# Altium PCB VA_NodeV1.2.PcbDoc (part 1 of 4)
Units mil, origin at the board's own origin, x right, y up, seen from the top; angles counter-clockwise.
Board outline 2925 x 2390 mil, 2 copper layers (Top Layer, Bottom Layer), stack 57 mil thick; 152 components, 110 nets, 488 pads, 205 vias.
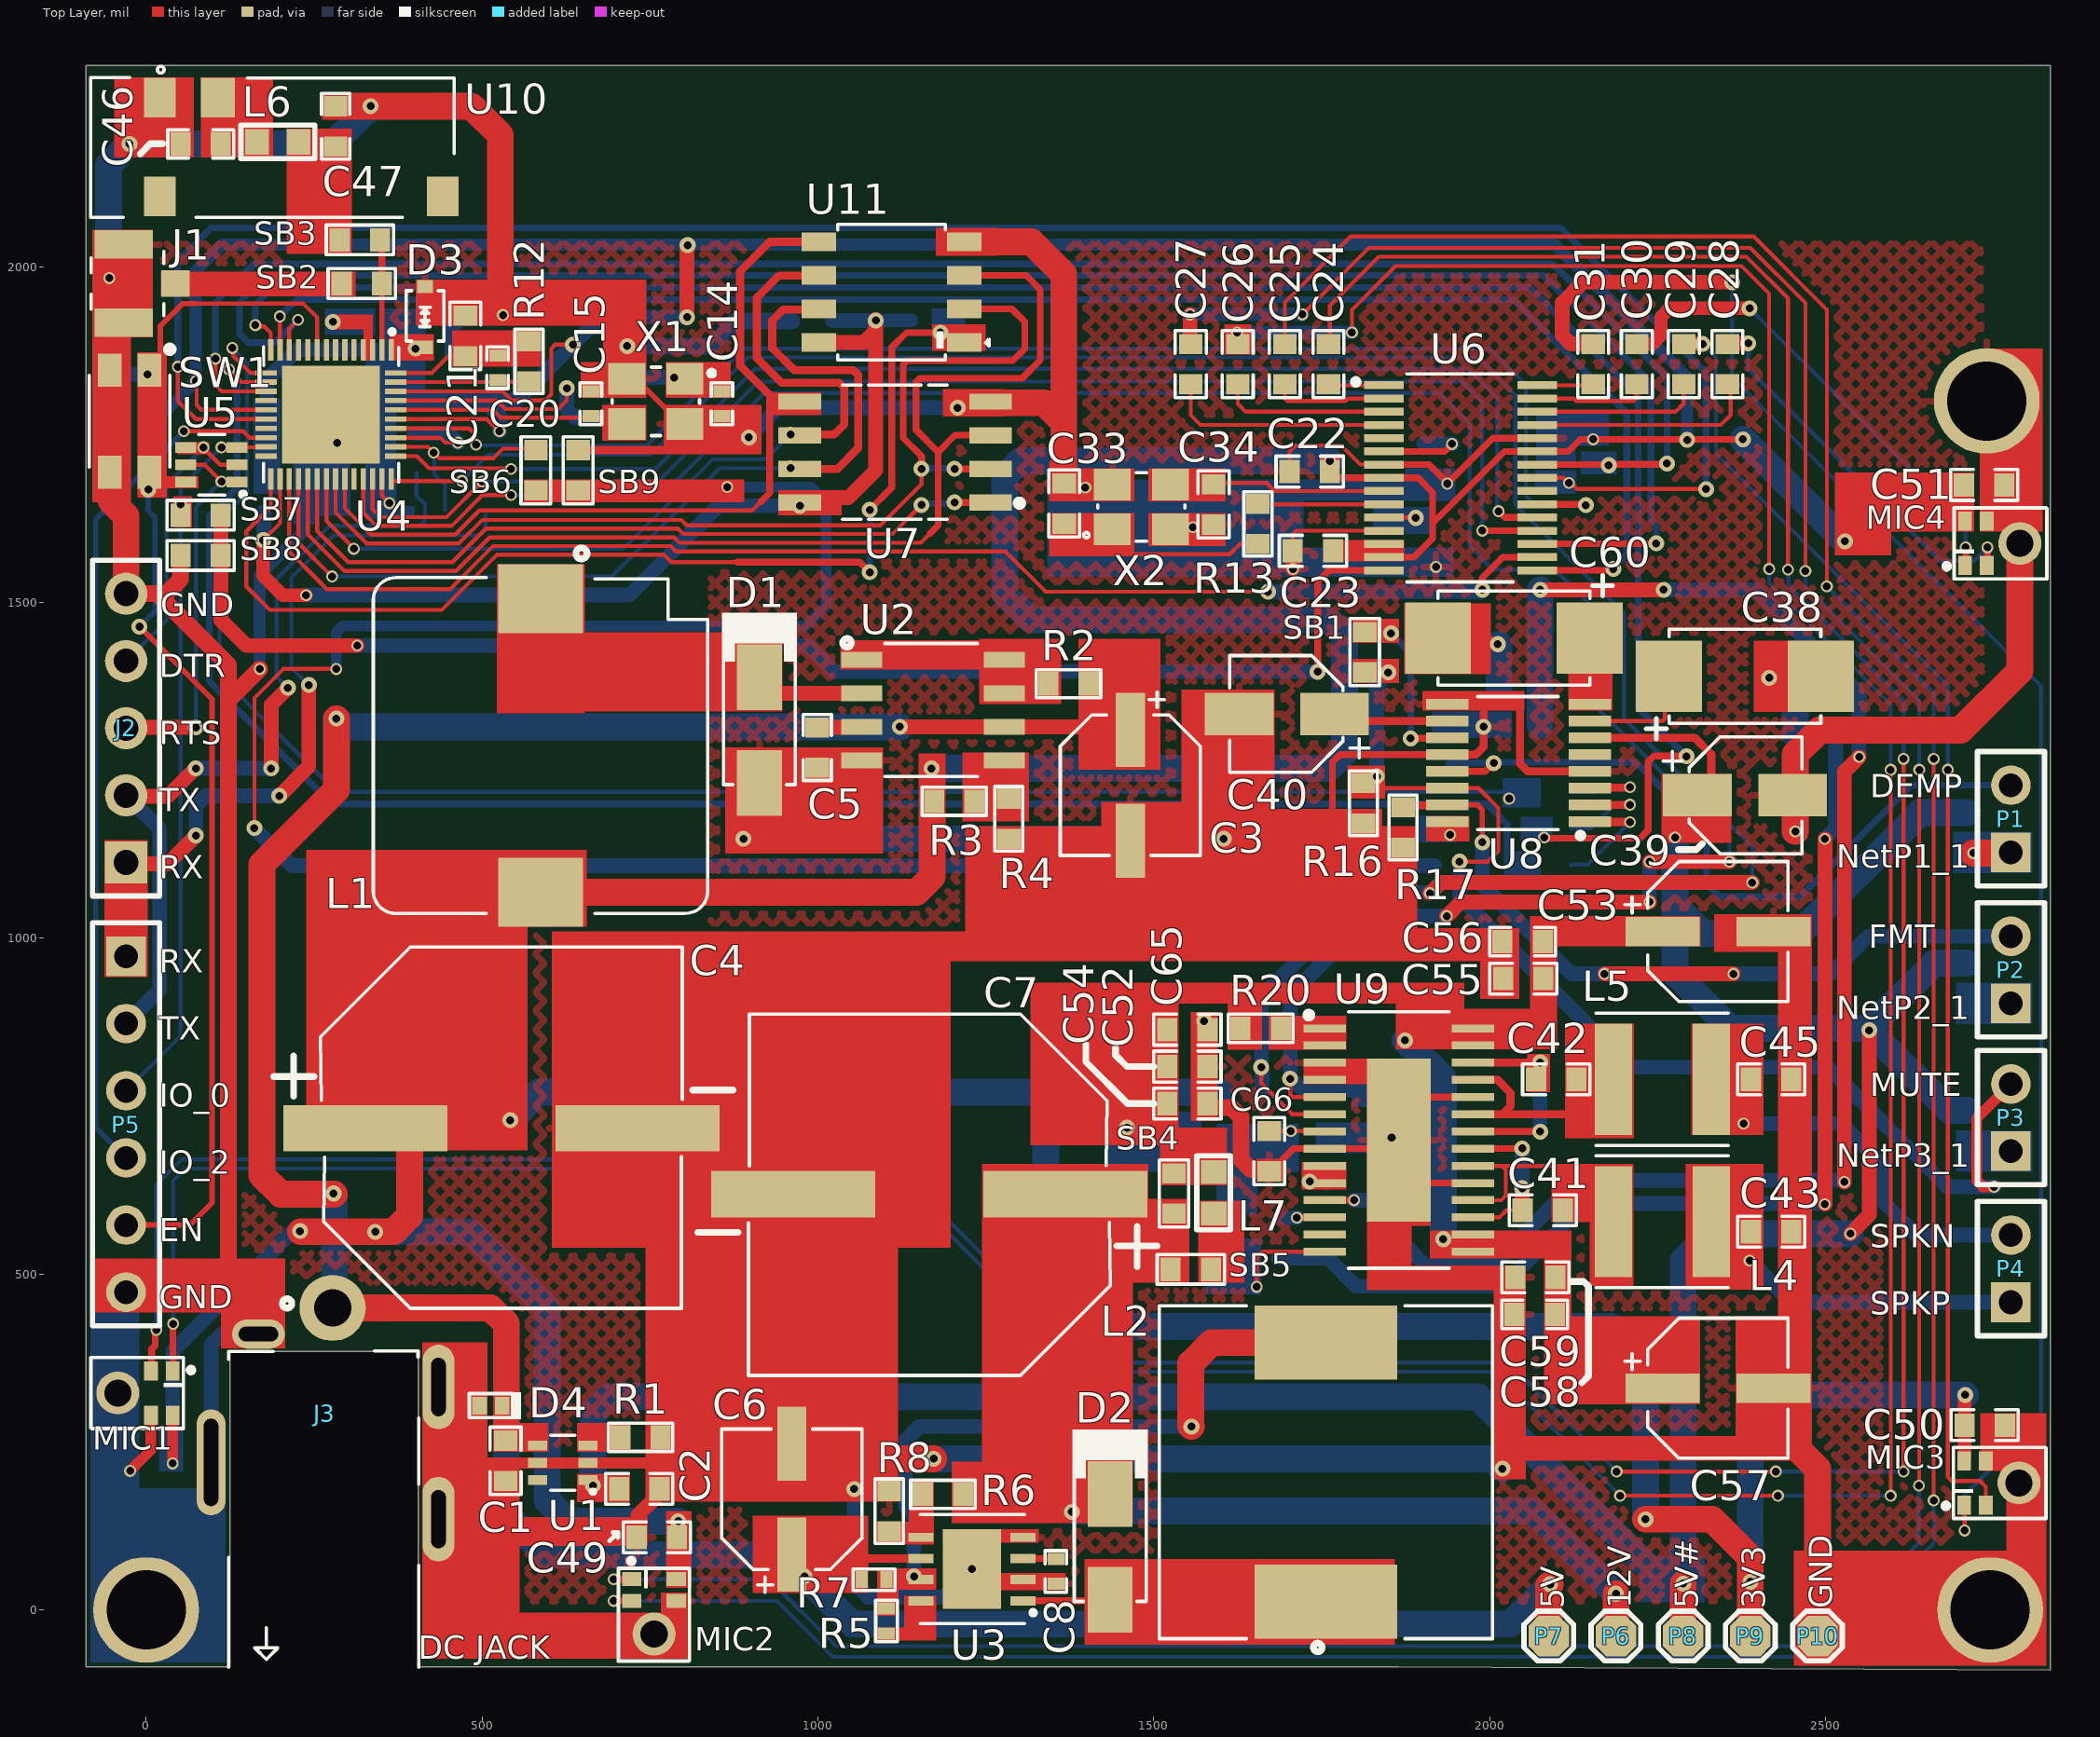
[diagram p0: Top Layer view]
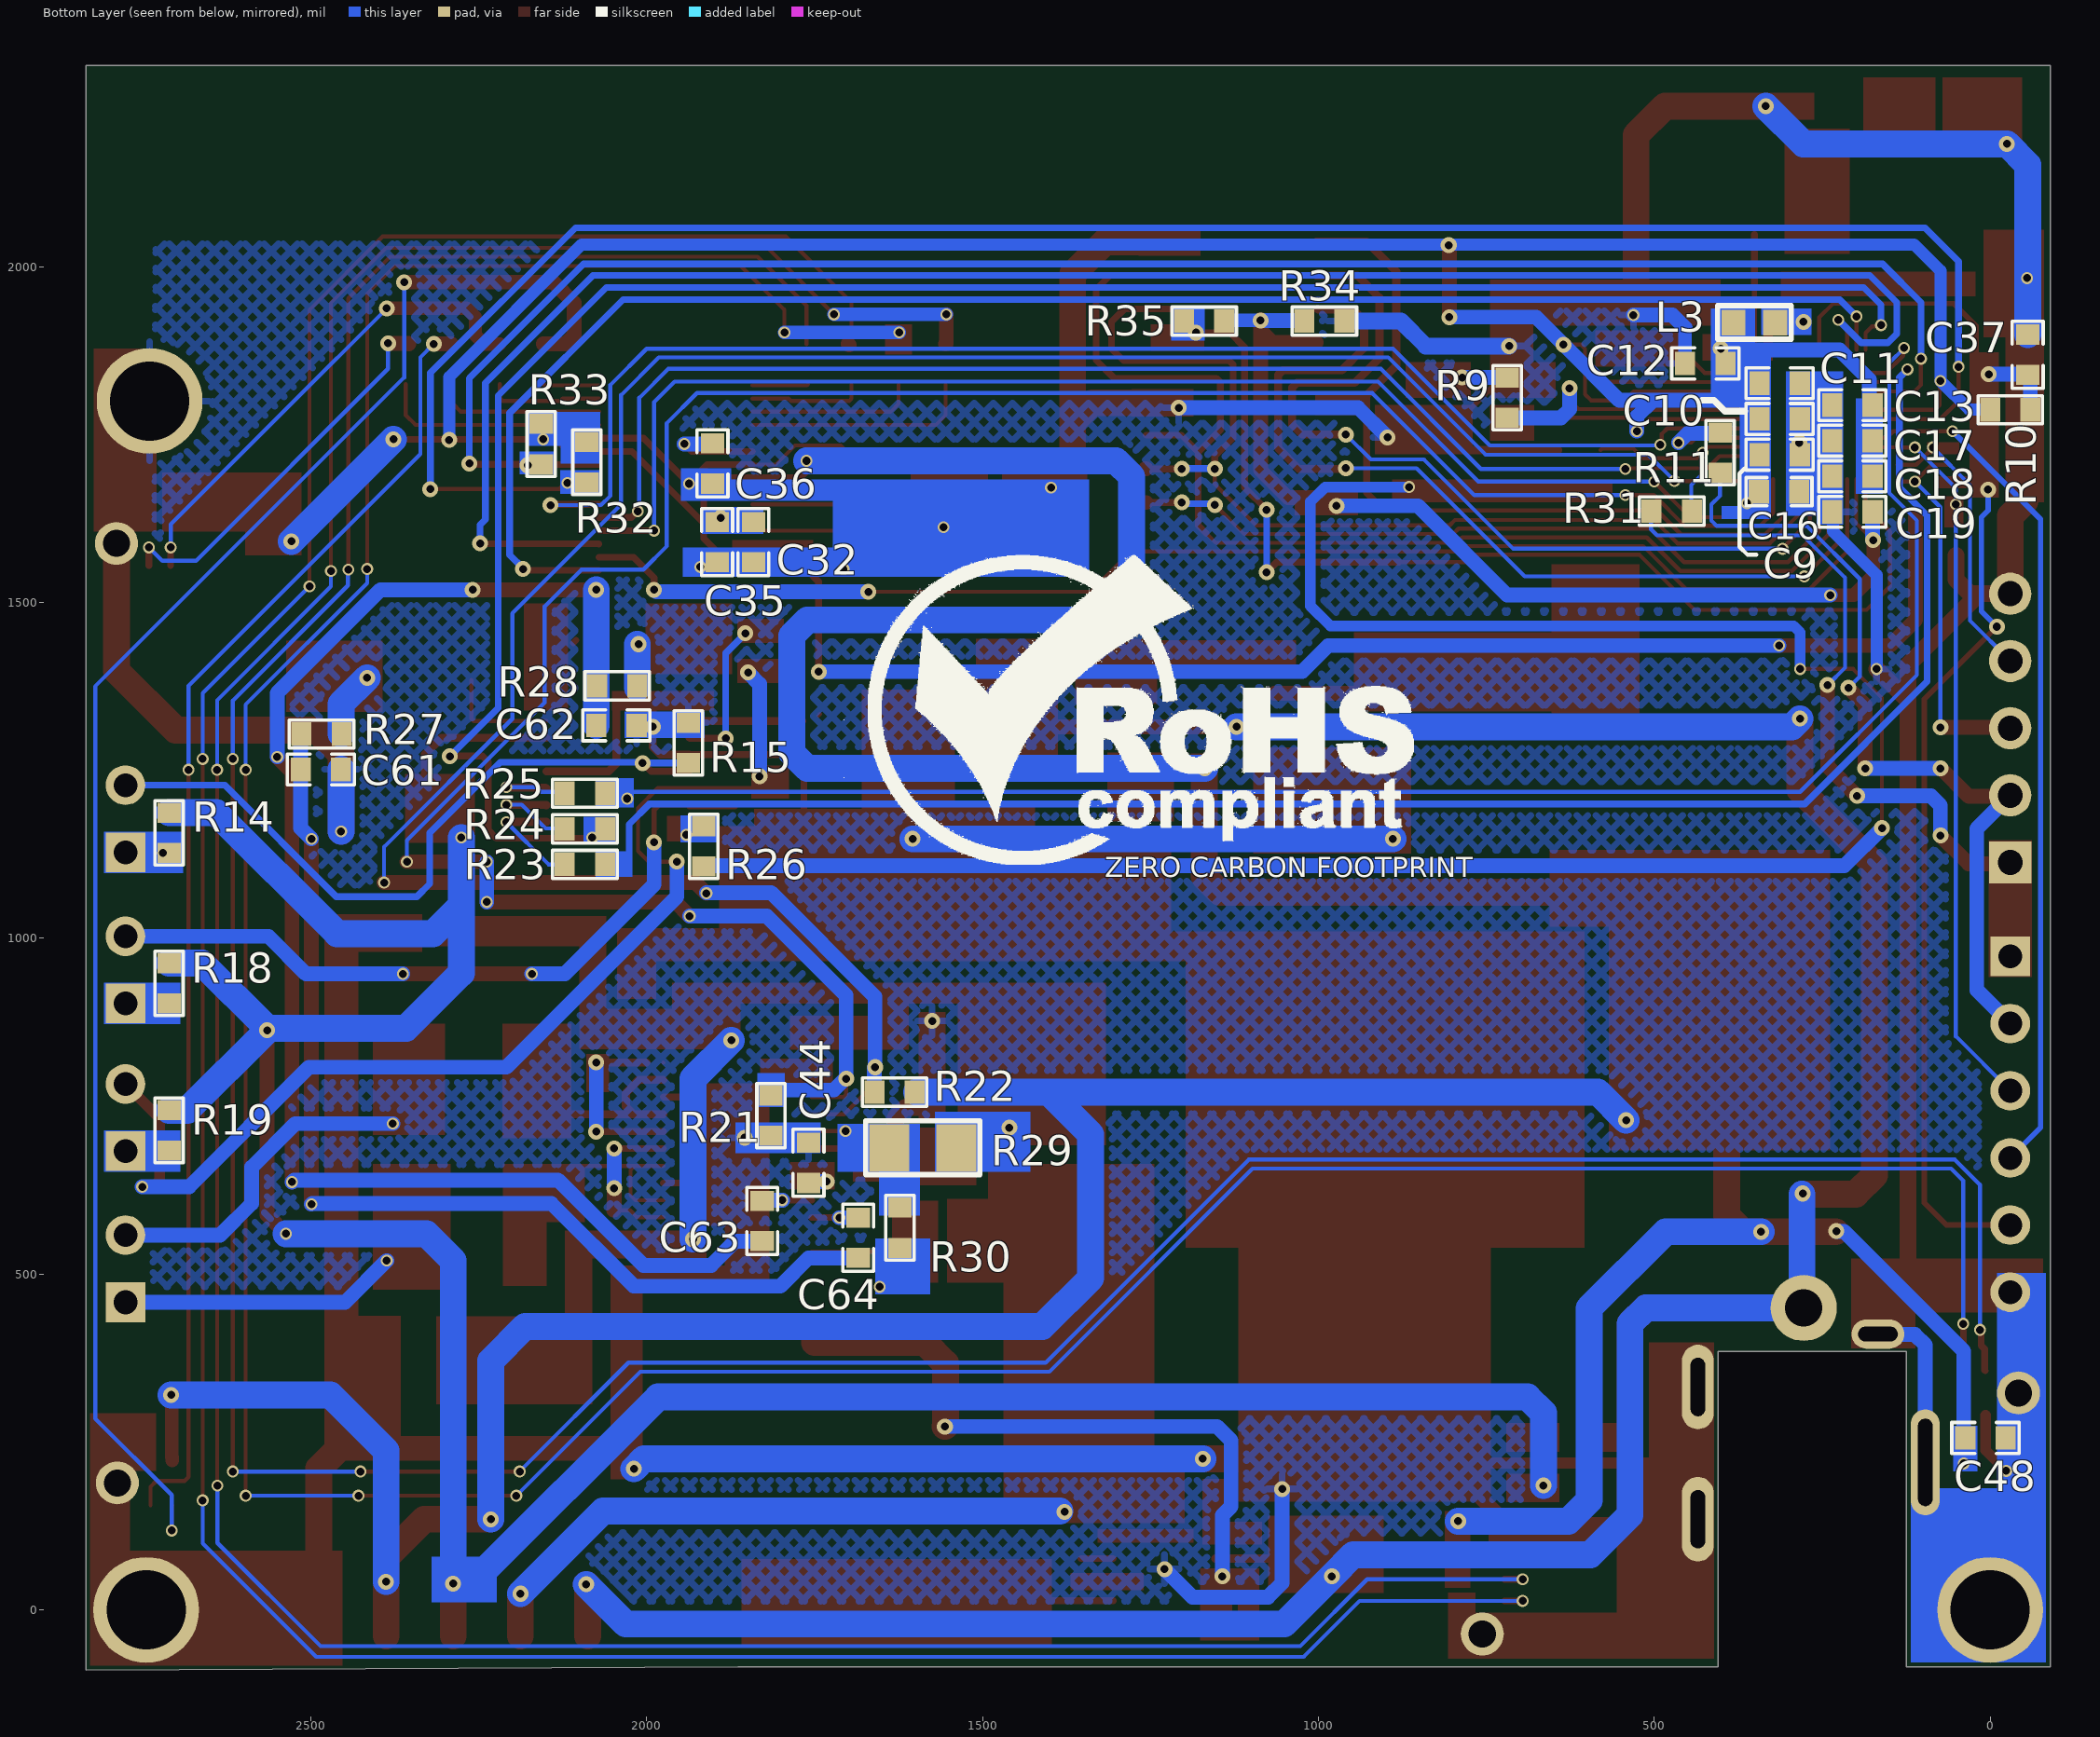
[diagram p1: Bottom Layer view, seen from below]
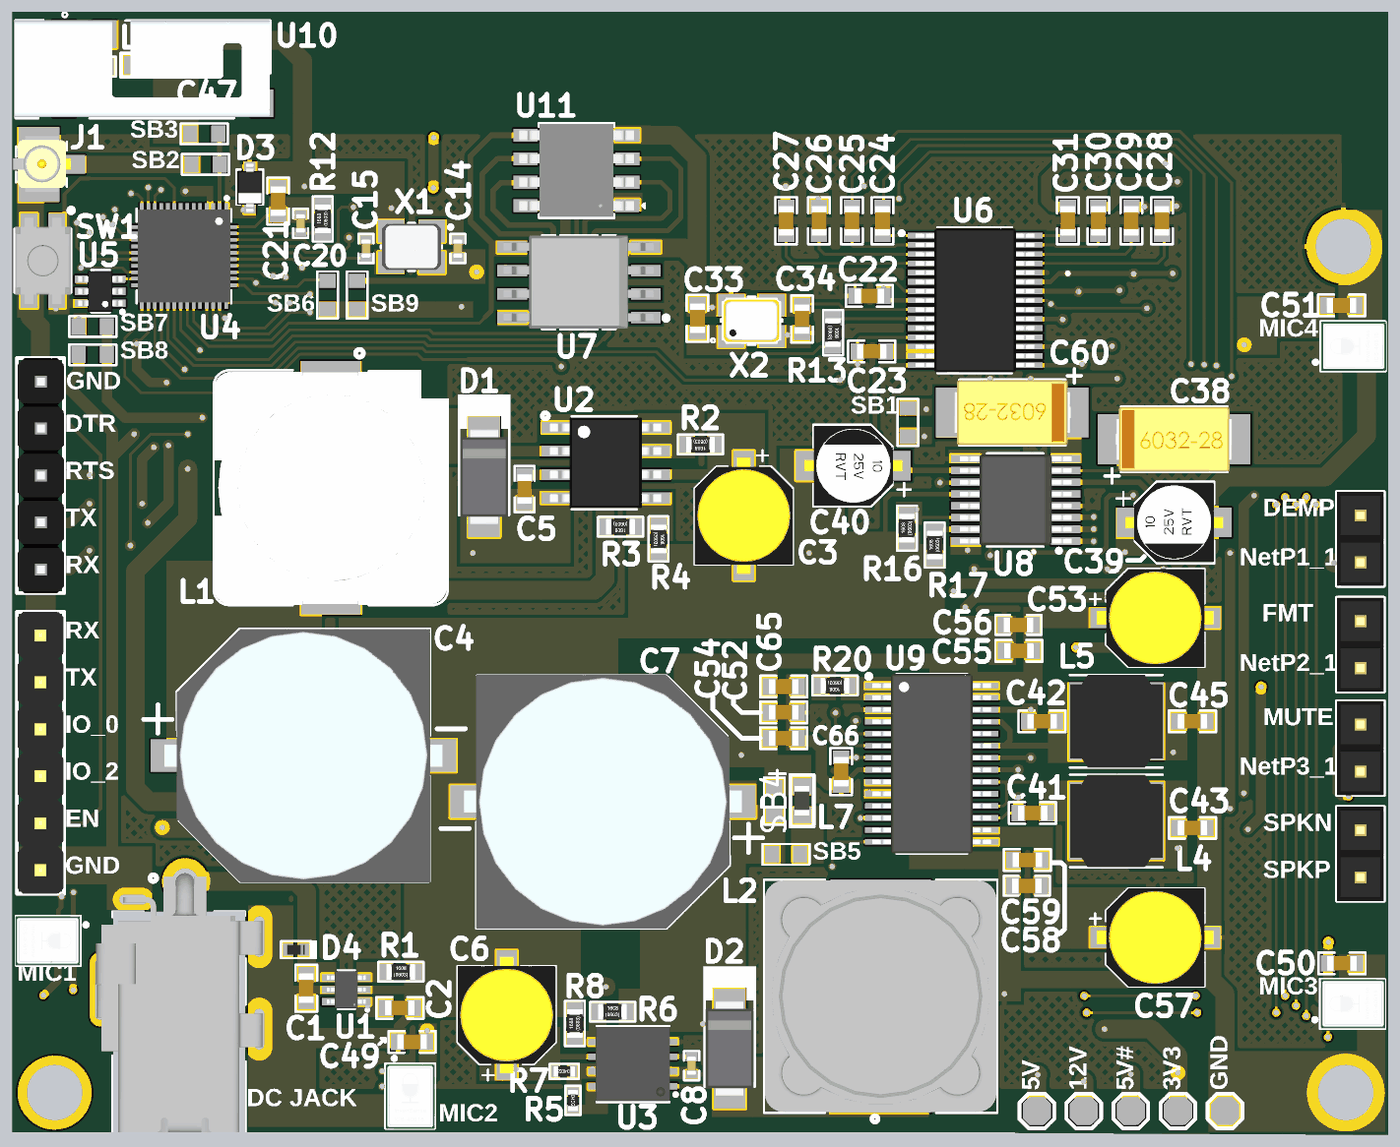
[diagram p3: 3D render of the assembled board from above, using the file's embedded part models]
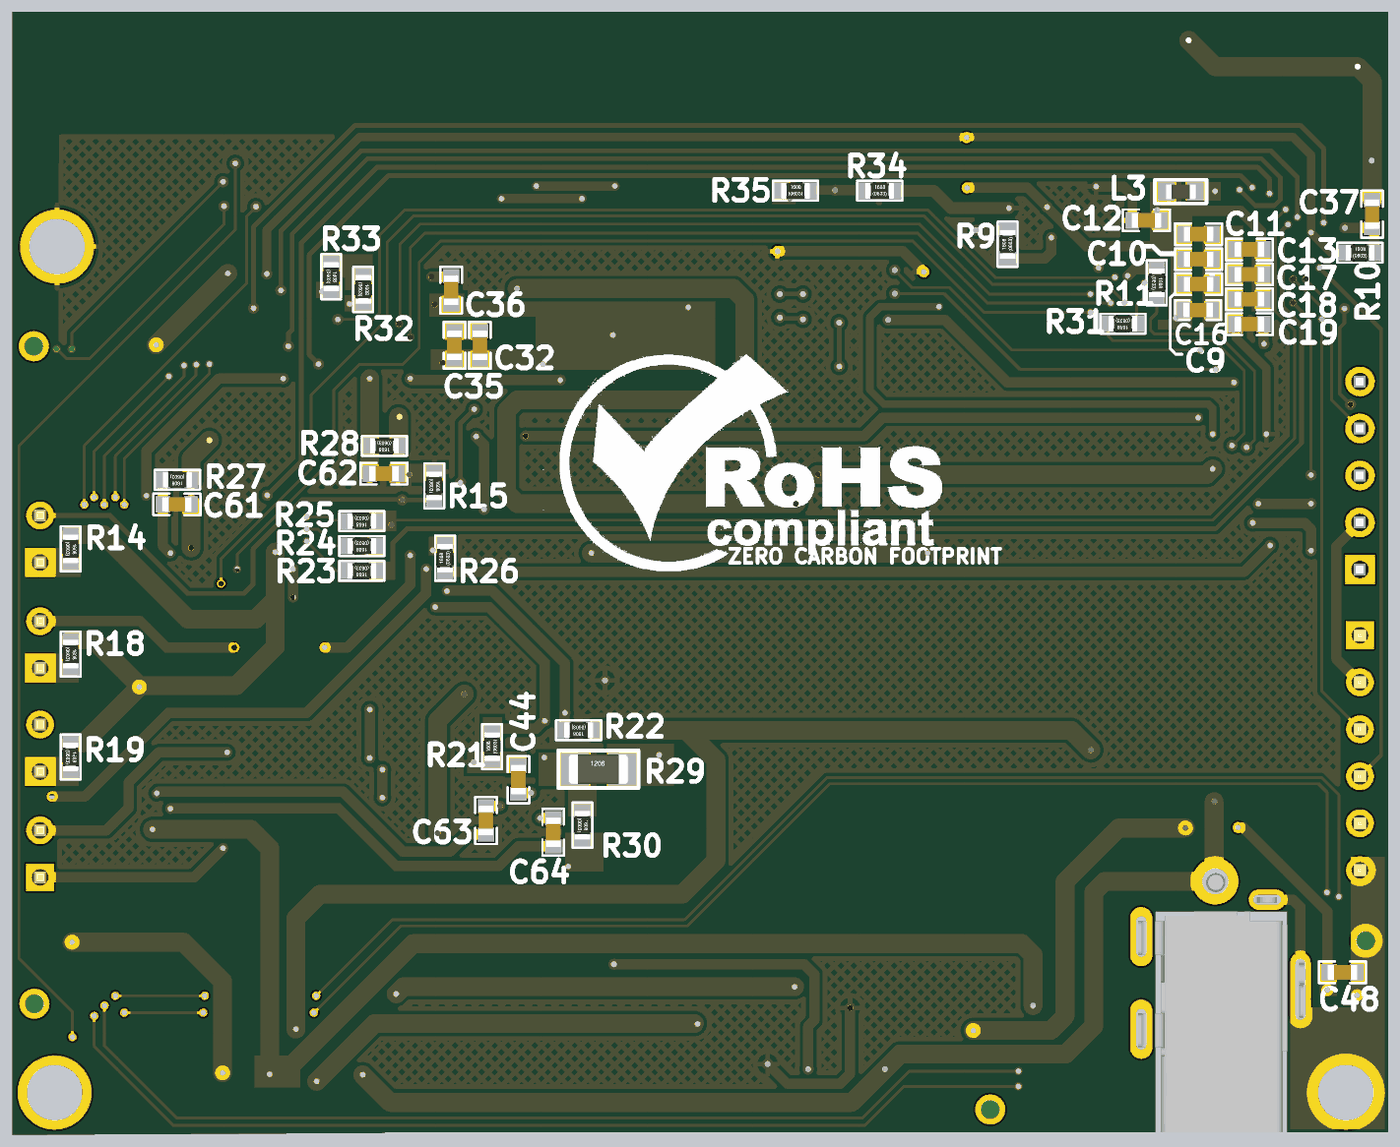
[diagram p4: 3D render of the assembled board from below, using the file's embedded part models]

## Layer stack, top to bottom
Top Solder: solder mask 3, Solder Resist, Dk 3.5
Top Layer: signal copper 10
Dielectric 1: dielectric 37, FR-4, Dk 4.8
Bottom Layer: signal copper 10
Bottom Solder: solder mask 3, Solder Resist, Dk 3.5

## Board outline
-90,-85 -90,130 -90,2300 2835,2300 2835,-90 1863.75,-85 405,-85 405,385 125,385 125,-85

## Design rules (kind name [scope] priority, off if disabled: settings)
Clearance [All] p1: gap=7 ignorepadtopadclearanceinfootprint=FALSE except(0: Arc-Hole Track-Hole SMDPad-Hole THPad-Hole Via-Hole Fill-Hole Poly-Hole Region-Hole Text-Hole; 4: Arc-SMDPad Track-SMDPad SMDPad-SMDPad)
HoleSize [All] p1: absolutevalues=TRUE maxlimit=1000 minlimit=1 maxpercent=80.000 minpercent=20.000
HoleToHoleClearance [All] p1: gap=0 allowstackedmicrovias=TRUE
MinimumSolderMaskSliver [All] p1: minsoldermaskwidth=0
PolygonConnect [All] p1: connectstyle=Relief reliefconductorwidth=10 reliefentries=4 polygonreliefangle="90 Angle" airgapwidth=10
RoutingVias [All] p1: holewidth=11.81 width=23.62 viastyle="Through Hole" minholewidth=11.81 minwidth=17.72 maxholewidth=11.81 maxwidth=23.62
SilkToSilkClearance [All] p1: silktosilkclearance=0
SilkToSolderMaskClearance [IsPad] p1: minsilkscreentomaskgap=0 clearancetoexposedcopper=TRUE
SolderMaskExpansion [All] p1: expansion=4 istentingtop=FALSE
Width [All] p1: maxlimit=40 minlimit=6 preferedwidth=22
25 further rules are at their usual default settings.

## Classes and differential pairs
component class U_Power_Section: C1 C2 C3 C4 C5 C6 C7 C8 D1 D2 L1 L2 P6 P7 P8 P9 P10 R1 R2 R3 R4 R5 R6 R7 R8 S U1 U2 U3
component class U_Mic_Section: C48 C49 C50 C51 MIC1 MIC2 MIC3 MIC4 S
component class U_Memory_Section: C19 R34 R35 S U7 U11
component class U_DAC_Section: C38 C39 C40 C60 C61 C62 P1 P2 P3 R14 R15 R16 R17 R18 R19 R23 R24 R25 R26 R27 R28 S SB1 U8
component class U_Controller_Section: C9 C10 C11 C12 C13 C14 C15 C16 C17 C18 C20 C21 C37 D3 L3 R9 R10 R11 R12 R31 S SB6 SB7 SB8 SB9 SW1 U4 U5 X1
component class U_Connector_Section: C46 C47 D4 J1 J2 J3 L6 P5 S SB2 SB3 U10
component class U_Amplifier_Section: C41 C42 C43 C44 C45 C52 C53 C54 C55 C56 C57 C58 C59 C63 C64 C65 C66 L4 L5 L7 P4 R20 R21 R22 R29 R30 S SB4 SB5 ss U9
component class U_ADC_Section: C22 C23 C24 C25 C26 C27 C28 C29 C30 C31 C32 C33 C34 C35 C36 R13 R32 R33 S U6 X2

## Components (designator, comment, footprint, x,y, rotation, side; value= is the part's Value field where it differs from the comment)
C1 "0.1uF" Cap0603#1 535,222 r90 top locked
C2 "0.1uF" Cap0603#1 734,180 r180 top locked
C3 "100uF" VKMB1001E101MV 1465,1227.68 r270 top locked
C4 "470uF" VT1H471MI135000CE0 529,717 r0 top
C5 "470pF" Cap0603#2 999,1284 r90 top locked
C6 "100uF" VKMB1001E101MV 961,165 r90 top
C7 "470uF" VT1H471MI135000CE0 1165.56,619 r180 top
C8 "1500pF" "Cap 0402" 1354.25,57.25 r90 top locked
C9 "10uF" Cap0603#1 313.23,1720.15 r0 bottom
C10 "1uF" Cap0603#1 313.23,1773.3 r0 bottom
C11 "0.1uF" Cap0603#1 313.23,1826.44 r0 bottom
C12 "1uF" Cap0603#1 424,1856 r180 bottom
C13 "0.1uF" Cap0603#1 205,1794 r180 bottom
C14 "22PF" Cap0402 857,1796 r90 top locked
C15 "22PF" Cap0402 662,1796 r270 top locked
C16 "100pF" "Cap 0603" 314.23,1665 r180 bottom
C17 "0.1uF" Cap0603#1 205,1741 r180 bottom
C18 "0.1uF" Cap0603#1 205,1688 r180 bottom
C19 "4.7uF" Cap0603#1 205,1635 r180 bottom
C20 "3.3nF" Cap0402 523,1849.5 r90 top locked
C21 "10nF" Cap0603#1 475,1897 r270 top locked
C22 "10uF" Cap0603#1 1732,1695 r0 top
C23 "0.1uF" Cap0603#1 1736.83,1577 r0 top
C24 "2.2uF" Cap0603#1 1760,1855 r90 top locked
C25 "2.2uF" Cap0603#1 1695,1855 r90 top locked
C26 "2.2uF" Cap0603#1 1625,1855 r90 top locked
C27 "2.2uF" Cap0603#1 1555,1855 r90 top locked
C28 "2.2uF" Cap0603#1 2354,1855 r90 top locked
C29 "2.2uF" Cap0603#1 2289,1855 r90 top locked
C30 "2.2uF" Cap0603#1 2219,1855 r90 top locked
C31 "2.2uF" Cap0603#1 2154,1855 r90 top locked
C32 "1uF" Cap0603#1 1841,1590 r270 bottom
C33 "18pF" Cap0603#1 1366.52,1647.31 r90 top
C34 "18pF" Cap0603#1 1589,1646 r270 top
C35 "0.1uF" Cap0603#1 1895,1590 r270 bottom
C36 "1uF" Cap0603#1 1902,1707 r90 bottom
C37 "0.1uF" Cap0603#1 -56,1869 r270 bottom locked
C38 "10uF" "Cap Case-C" 2380,1390 r180 top
C39 "10uF" RVT1E100M0405. 2380,1213 r0 top locked
C40 "10uF" RVT1E100M0405. 1698,1334 r180 top locked
C41 "0.47uF" Cap0603#1 2079,595 r0 top locked
C42 "0.47uF" Cap0603#1 2099,790 r0 top locked
C43 "1uF" Cap0603#1 2419,563 r0 top locked
C44 "1uF" Cap0603#1 1759,665.59 r90 bottom locked
C45 "1uF" Cap0603#1 2419,790 r0 top locked
C46 "2.7pF" "Cap 0603" 81,2183 r0 top locked
C47 "4.7pF" "Cap 0603" 282,2209 r90 top
C48 "0.1uF" Cap0603#1 7,256 r0 bottom
C49 "0.1uF" Cap0603#1 760,108 r0 top
C50 "0.1uF" Cap0603#1 2737,275 r180 top
C51 "0.1uF" Cap0603#1 2736,1675 r180 top
C52 "1nF" Cap0603#1 1550,809 r180 top locked
C53 "100uF" VKMB1001E101MV 2340,1010 r0 top locked
C54 "1uF" Cap0603#1 1550,754 r180 top locked
C55 "1uF" Cap0603#1 2050,940 r0 top locked
C56 "1nF" Cap0603#2 2049,995 r180 top locked
C57 "100uF" VKMB1001E101MV 2340,330 r0 top locked
C58 "1uF" Cap0603#1 2068,495 r0 top locked
C59 "1nF" Cap0603#2 2067,440 r180 top locked
C60 "10uF" "Cap Case-C" 2036,1447 r0 top
C61 "1nF" Cap0603#1 2485,1251.5 r0 bottom locked
C62 "1nF" Cap0603#1 2045,1317 r0 bottom locked
C63 "1uF" Cap0603#1 1828,579 r270 bottom locked
C64 "1uF" Cap0603#1 1685,554 r270 bottom locked
C65 "1nF" Cap0603#1 1550,864 r180 top locked
C66 "1uF" Cap0603#1 1672,683 r90 top locked
D1 "SS24A" SMA 913,1310 r270 top
D2 "SS24A" SMA 1435,93.74 r270 top locked
D3 "UDD32C03L01" UDD32C03L01 415,1925.28 r90 top
D4 "ESD5451N-2/TR" DFN1006-2L 513,304 r180 top
J1 "U.FL-R-SMT-1(80)" U.FL-R-SMT-1(80) 5,1975 r90 top locked
J2 "3-644456-5" HDR1X5 -30,1113 r90 top locked
J3 "DC-C024E-7A-1.65" DC-C024E-7A-1.65 265.71,292.28 r90 top
L1 "220uH" SLF12575T-221M1R3-PF 587,1287 r270 top locked
L2 "180uH" YPRH1207-181M 1756,205 r90 top locked
L3 "2nH" "IND 0603" 350.91,1917 r180 bottom
L4 "33uH" SWPA5040S330MT 2257,578 r0 top locked
L5 "33uH" SWPA5040S330MT 2257,790 r0 top locked
L6 "1.6nH" "IND 0603" 196,2186 r0 top
L7 "BLM18PG121SN1D" "IND 0603" 1589,621 r90 top locked
MIC1 "ICS-40618" ICS-40618 -1.46,322.97 r90 top
MIC2 "ICS-40618" ICS-40618 756,4.83 r180 top
MIC3 "ICS-40618" ICS-40618 2747.17,189 r270 top
MIC4 "ICS-40618" ICS-40618 2748.46,1587.97 r270 top
P1 "61300211121" HDR1X2 2776,1128 r90 top
P2 "61300211121" HDR1X2 2776,903 r90 top
P3 "61300211121" HDR1X2 2776,683 r90 top
P4 "61300211121" HDR1X2 2776,458 r90 top
P5 "61300611121" HDR1X6 -30,973 r270 top locked
P6 "TEST POINT" "TEST POINT" 2188,-39 r0 top locked
P7 "TEST POINT" "TEST POINT" 2088,-39 r0 top locked
P8 "TEST POINT" "TEST POINT" 2288,-39 r0 top locked
P9 "TEST POINT" "TEST POINT" 2388,-39 r0 top locked
P10 "TEST POINT" "TEST POINT" 2488,-39 r0 top locked
R1 "10K" Res0603 736,257 r180 top
R2 "0.33R" Res0603 1373,1379 r0 top value=0.33Ω
R3 "2K" Res0603 1203,1204 r0 top
R4 "1.2K" Res0603 1284,1178 r90 top
R5 "180R" Res0402 1102,-16.5 r270 top locked
R6 "19K1" Res0603 1186,172 r180 top
R7 "0.22R" Res0402 1083.5,45 r180 top locked
R8 "2K2" Res0603 1106,147 r270 top
R9 "0R" Res0603 719,1805 r270 bottom
R10 "10K" Res0603 -30,1787 r0 bottom
R11 "499R" Res0603 402,1723 r90 bottom
R12 "20K" Res0603 570,1859 r270 top
R13 "0R" Res0603 1655,1617 r90 top
R14 "10K" Res0603 2711,1157 r90 bottom
R15 "10K" Res0603 1938,1291 r90 bottom
R16 "10K" Res0603 1812,1201 r270 top
R17 "10K" Res0603 1871,1165 r270 top
R18 "10K" Res0603 2711,933 r90 bottom
R19 "10K" Res0603 2711,714 r90 bottom
R20 "100K" Res0603 1659,866 r0 top
R21 "10K" Res0603 1815,736 r270 bottom
R22 "10K" Res0603 1631,771 r180 bottom
R23 "22R" Res0603 2092,1110 r180 bottom
R24 "22R" Res0603 2092,1163 r180 bottom
R25 "22R" Res0603 2092,1216 r180 bottom
R26 "22R" Res0603 1915,1137 r270 bottom
R27 "8K2" Res0603 2484,1304 r180 bottom
R28 "8K2" Res0603 2044,1376 r180 bottom
R29 "10R" Res1206 1589,688 r180 bottom locked
R30 "100K" Res0603 1623,569 r90 bottom locked
R31 "1K" Res0603 474,1636 r180 bottom
R32 "4.7K" Res0603 2089,1709 r90 bottom
R33 "4.7K" Res0603 2157,1736 r90 bottom
R34 "2K" Res0603 991,1919 r0 bottom
R35 "10K" Res0603 1170,1919 r0 bottom
SB1 "Solder Bridge" "Solder Bridge" 1814,1426 r90 top locked
SB2 "Solder Bridge" "Solder Bridge" 320.79,1975 r180 top locked
SB3 "Solder Bridge" "Solder Bridge" 318,2040 r180 top
SB4 "Solder Bridge" "Solder Bridge" 1530,620 r90 top locked
SB5 "Solder Bridge" "Solder Bridge" 1555,507 r0 top
SB6 "Solder Bridge" "Solder Bridge" 580,1697 r270 top locked
SB7 "Solder Bridge" "Solder Bridge" 81,1630 r180 top locked
SB8 "Solder Bridge" "Solder Bridge" 81,1570 r180 top locked
SB9 "Solder Bridge" "Solder Bridge" 643,1697 r90 top locked
SW1 "TS-1185EC-C-D-B" TS-1185EC-C-D-B -25,1770 r270 top locked
U1 "MIC94062YC6-TR" SC-70-6 620,219 r180 top locked
U2 "MC34063ADR" SOIC-8 1171.3,1340 r0 top locked
U3 "MC33063ADRJR" MC33063ADRJR 1229.21,60.75 r180 top locked
U4 "ESP32-D0WD-V3" ESP32-D0WD-V3 275,1780 r270 top locked
U5 "UMH3N" UMH3N 97,1705 r180 top locked
U6 "PCM1865DBTR" PCM1865DBTR 1956.83,1685.63 r0 top locked
U7 "W25Q64FVSSIQ" SOP-8_208mil 1114.87,1724 r180 top
U8 "PCM1754DBQR" 16-SSOP 2043.09,1261 r180 top locked
U9 "TPA3111D1PWPR" 28-HTSSOP 1864.76,699.57 r0 top locked
U10 "PRO-OB-440" PRO-OB-440 230.63,2178.43 r90 top locked
U11 "LY68L6400SLIT" SOP-8 1109.48,1962 r180 top locked
X1 "40MHz" X322540MPB4SI 758.69,1799.46 r180 top locked value=40MHZ
X2 "24.576MHz" S3224576121060 1481.52,1642.31 r0 top locked

## Footprints (in the part's own frame and the unit in brackets; to place one, negate y for a bottom-side part, rotate by r counter-clockwise, add the part's x,y. Pads: shape width x height; smd on the part's side, far side on the other; paste and mask are expansions set on the pad)
16-SSOP [mm]
  rect 1.6x0.41 smd: 1(-2.7,2.222) 2(-2.7,1.587) 3(-2.7,0.952) 4(-2.7,0.317) 5(-2.7,-0.318) 6(-2.7,-0.953) 7(-2.7,-1.588) 8(-2.7,-2.223) 9(2.7,-2.222) 10(2.7,-1.587) 11(2.7,-0.952) 12(2.7,-0.317) 13(2.7,0.318) 14(2.7,0.953) 15(2.7,1.588) 16(2.7,2.223)
  silkscreen extent -2.43,-2.51 1.55,2.83, body extent -3.01,-2.45 3.01,2.45, height 1.62
28-HTSSOP [mm]
  rect 1.6x0.3 smd: 1(-2.8,4.225) 2(-2.8,3.575) 3(-2.8,2.925) 4(-2.8,2.275) 5(-2.8,1.625) 6(-2.8,0.975) 7(-2.8,0.325) 8(-2.8,-0.325) 9(-2.8,-0.975) 10(-2.8,-1.625) 11(-2.8,-2.275) 12(-2.8,-2.925) 13(-2.8,-3.575) 14(-2.8,-4.225) 15(2.8,-4.225) 16(2.8,-3.575) 17(2.8,-2.925) 18(2.8,-2.275) 19(2.8,-1.625) 20(2.8,-0.975) 21(2.8,-0.325) 22(2.8,0.325) 23(2.8,0.975) 24(2.8,1.625) 25(2.8,2.275) 26(2.8,2.925) 27(2.8,3.575) 28(2.8,4.225)
  rect 2.4x6.17 smd: 29(0,0)
  silkscreen extent -3.52,-4.85 1.91,4.85, body extent -3.2,-4.85 3.2,4.85, height 1.2
Cap0402 [mil]
  rect 18x25 smd mask+2.36: 1(-18.5,0) 2(18.5,0)
  silkscreen extent -31,-16 31,16, body extent -20,-10 20,10, height 19
Cap0603#1 [mil]
  rect 30x35 smd: 1(30,0) 2(-30,0)
  silkscreen extent -50,-23 50,23, body extent -31,-16 32,16, height 34
Cap0603#2 [mil]
  rect 30x35 smd mask+2.36: 1(-30,0) 2(30,0)
  silkscreen extent -49,-21 49,21, body extent -32,-16 31,16, height 34
"Cap 0402" [mil]
  rect 18x25 smd mask+2.36: 1(-18.5,0) 2(18.5,0)
  silkscreen extent -31,-16 31,16, body extent -20,-10 20,10, height 19
"Cap 0603" [mil]
  rect 30x35 smd mask+2.36: 1(-30,0) 2(30,0)
  silkscreen extent -49,-21 49,21, body extent -32,-16 31,16, height 34
"Cap Case-C" [mm] "Case-C"
  rect 2.5x2.7 smd: 1(-2.87,0) 2(2.87,0)
  silkscreen extent -2.87,-1.78 3.73,2.36, body extent -3.15,-1.75 3.15,1.75, height 2.8
DC-C024E-7A-1.65 [mm]
  round 2.5 hole 1.4: 1(3.995,-0.3)
  oval 4x1.1 hole 0.55 slot 3.3 at 0 deg: 2(-1.845,4.3)
  oval 1.1x2 hole 0.55 slot 1.5 at 90 deg: 3(3.005,2.507)
  oval 3.2x1.2 hole 0.55 slot 2.2 at 0 deg: 4(-3.995,-4.3) 5(1.005,-4.3)
  silkscreen extent -9.6,-3.56 4.35,3.63, body extent -9.57,-4.48 4.43,4.52, height 5.05
DFN1006-2L [mm]
  rect 0.55x0.66 smd: 1(-0.425,0) 2(0.425,0)
  silkscreen extent -1.14,-0.51 0.81,0.51, body extent -0.48,-0.29 0.48,0.28, height 0.43
ESP32-D0WD-V3 [mm]
  rect 0.81x0.2 smd: 1(-2.445,2.275) 2(-2.445,1.925) 3(-2.445,1.575) 4(-2.445,1.225) 5(-2.445,0.875) 6(-2.445,0.525) 7(-2.445,0.175) 8(-2.445,-0.175) 9(-2.445,-0.525) 10(-2.445,-0.875) 11(-2.445,-1.225) 12(-2.445,-1.575) 13(-2.445,-1.925) 14(-2.445,-2.275) 25(2.445,-2.275) 26(2.445,-1.925) 27(2.445,-1.575) 28(2.445,-1.225) 29(2.445,-0.875) 30(2.445,-0.525) 31(2.445,-0.175) 32(2.445,0.175) 33(2.445,0.525) 34(2.445,0.875) 35(2.445,1.225) 36(2.445,1.575) 37(2.445,1.925) 38(2.445,2.275)
  rect 0.2x0.81 smd: 15(-1.575,-2.445) 16(-1.225,-2.445) 17(-0.875,-2.445) 18(-0.525,-2.445) 19(-0.175,-2.445) 20(0.175,-2.445) 21(0.525,-2.445) 22(0.875,-2.445) 23(1.225,-2.445) 24(1.575,-2.445) 39(1.575,2.445) 40(1.225,2.445) 41(0.875,2.445) 42(0.525,2.445) 43(0.175,2.445) 44(-0.175,2.445) 45(-0.525,2.445) 46(-0.875,2.445) 47(-1.225,2.445) 48(-1.575,2.445)
  rect 3.7x3.7 smd paste-3: 49(0,0)
  silkscreen extent -3.2,-2.55 2.56,2.56, body extent -2.5,-2.5 2.5,2.5, height 0.9
HDR1X2 [mm] "CONN HEADER VERT 2POS 2.54MM"
  rect 1.5x1.5 hole 0.9: 1(0,0)
  round 1.5 hole 0.9: 2(2.54,0)
  silkscreen extent -1.27,-1.27 3.81,1.27, body extent -1.27,-1.27 3.81,1.27, height 8.44
HDR1X5 [mm] "Connector; Header; 5 Position"
  rect 1.6x1.6 hole 0.95: 1(0,0)
  round 1.6 hole 0.95: 2(2.54,0) 3(5.08,0) 4(7.62,0) 5(10.16,0)
  silkscreen extent -1.27,-1.27 11.43,1.27, body extent -1.27,-1.27 11.43,1.23, height 8.65
HDR1X6 [mm] "Connector; Header; 6 Position"
  rect 1.5x1.5 hole 0.9: 1(0,0)
  round 1.5 hole 0.9: 2(2.54,0) 3(5.08,0) 4(7.62,0) 5(10.16,0) 6(12.7,0)
  silkscreen extent -1.27,-1.27 13.97,1.27, body extent -1.27,-1.24 13.97,1.25, height 8.54
ICS-40618 [mm] "MICROPHONE MEMS ANALOG OMNI"
  rect 0.725x0.522 smd: 1(0.838,-1.037) 2(0.838,-0.215) 4(-0.837,-0.215) 5(-0.837,-1.037)
  round 1.625 hole 1.025: 3(0,1.037)
  rect 0.625x0.422 smd: 4(-0.837,-0.215)
  silkscreen extent -1.35,-1.8 1.35,2.06, body extent -1.32,-1.42 1.33,2.08, height 0.98
"IND 0603" [mm]
  rect 0.9x0.97 smd: 1(-0.785,0) 2(0.785,0)
  silkscreen extent -1.4,-0.64 1.4,0.64, body extent -0.8,-0.4 0.8,0.4, height 0.78
MC33063ADRJR [mm]
  rect 0.95x0.35 smd: 1(-1.925,1.2) 1(-1.925,1.2) 2(-1.925,0.4) 3(-1.925,-0.4) 4(-1.925,-1.2) 5(1.925,-1.2) 6(1.925,-0.4) 7(1.925,0.4) 8(1.925,1.2)
  rect 2.2x3 smd: 9(0,0)
  silkscreen extent -2.36,-2.06 1.96,2.06, body extent -2,-2 2,2, height 0.85
PCM1865DBTR [mm]
  rect 1.5x0.3 smd: 1(-2.9,3.5) 2(-2.9,3) 3(-2.9,2.5) 4(-2.9,2) 5(-2.9,1.5) 6(-2.9,1) 7(-2.9,0.5) 8(-2.9,0) 9(-2.9,-0.5) 10(-2.9,-1) 11(-2.9,-1.5) 12(-2.9,-2) 13(-2.9,-2.5) 14(-2.9,-3) 15(-2.9,-3.5) 16(2.9,-3.5) 17(2.9,-3) 18(2.9,-2.5) 19(2.9,-2) 20(2.9,-1.5) 21(2.9,-1) 22(2.9,-0.5) 23(2.9,0) 24(2.9,0.5) 25(2.9,1) 26(2.9,1.5) 27(2.9,2) 28(2.9,2.5) 29(2.9,3) 30(2.9,3.5)
  silkscreen extent -4.06,-3.94 1.98,3.94, body extent -3.2,-3.9 3.2,3.9, height 1.13
PRO-OB-440 [mm] "RF ANT 2.4GHZ STAMPED MET SLD"
  rect 1.5x1.2 smd: 1(1.865,5.35) 3(-1.865,5.35) 4(-1.865,-5.35)
  rect 1.5x1.28 smd: 2(1.865,3.15)
  silkscreen extent -2.67,-5.79 3.05,7.96, body extent -2.62,-5.74 2.62,8.01, height 3.5
Res0402 [mil]
  rect 18x25 smd mask+4: 1(-18.5,0) 2(18.5,0)
  silkscreen extent -32,-17 32,16, body extent -23,-11 23,11, height 16
Res0603 [mil]
  rect 30x35 smd: 1(-30,0) 2(30,0)
  silkscreen extent -48,-21 48,21, body extent -31,-17 31,17, height 18
Res1206 [mil]
  rect 60x70 smd: 1(-50,0) 2(50,0)
  silkscreen extent -85,-40 85,40, body extent -63,-31 63,32, height 39
RVT1E100M0405. [mm] "10uF 25V 5.4mm SMD"
  rect 2.6x1.6 smd: 1(-1.8,0) 2(1.8,0)
  silkscreen extent -3.1,-2.21 2.16,2.21, body extent -2.65,-2.15 2.65,2.15, height 3.95
S3224576121060 [mm] "24.576MHz SMD Crystal Resonator 12pF 60O ±10ppm -40?~+85? SMD3225-4P Crystals ROHS"
  rect 1.4x1.2 smd: 1(-1.1,-0.85) 2(1.1,-0.85) 3(1.1,0.85) 4(-1.1,0.85)
  silkscreen extent -2.18,-1.3 1.65,1.3, body extent -1.6,-1.25 1.6,1.25, height 0.82
SC-70-6 [mm]
  rect 0.73x0.38 smd: 1(-0.95,0.65) 2(-0.95,0) 3(-0.95,-0.65) 4(0.95,-0.65) 5(0.95,0) 6(0.95,0.65)
  silkscreen extent -1.2,-1.04 0.46,1.15, body extent -1.05,-1 1.05,1, height 0.92
SLF12575T-221M1R3-PF [mm]
  rect 2.6x3.2 smd: 1(-5.55,0) 2(5.55,0)
  silkscreen extent -7.48,-6.32 6.35,6.32, body extent -6.27,-6.33 6.33,6.27, height 7.5
SMA [mm]
  rect 2.5x1.7 smd: 1(-2,0) 2(2,0)
  silkscreen extent -4.44,-1.42 2.06,1.42, body extent -2.6,-1.3 2.6,1.3, height 2.4
SOIC-8 [mm]
  rect 1.55x0.6 smd: 1(-2.7,1.905) 2(-2.7,0.635) 3(-2.7,-0.635) 4(-2.7,-1.905) 5(2.7,-1.905) 6(2.7,-0.635) 7(2.7,0.635) 8(2.7,1.905)
  silkscreen extent -3.41,-2.51 1.68,2.7, body extent -3,-2.45 3,2.45, height 1.7
"Solder Bridge" [mil] "Solder Bridge ON"
  rect 30x35 smd: 1(-30,0) 2(30,0)
  silkscreen extent -50,-22 50,22
SOP-8 [mm]
  rect 1.3x0.7 smd: 1(-2.75,1.905) 2(-2.75,0.635) 3(-2.75,-0.635) 4(-2.75,-1.905) 5(2.75,-1.905) 6(2.75,-0.635) 7(2.75,0.635) 8(2.75,1.905)
  silkscreen extent -3.69,-2.57 2.03,2.57, body extent -3.1,-2.5 3.1,2.5, height 1.76
SOP-8_208mil [mm]
  rect 1.61x0.61 smd: 1(-3.605,1.905) 2(-3.605,0.635) 3(-3.605,-0.635) 4(-3.605,-1.905) 5(3.605,-1.905) 6(3.605,-0.635) 7(3.605,0.635) 8(3.605,1.905)
  silkscreen extent -4.8,-2.54 2,2.54, body extent -4.04,-2.51 4.09,2.49, height 2
SWPA5040S330MT [mm]
  rect 1.4x4.2 smd: 1(-1.85,0) 2(1.85,0)
  silkscreen extent -2.5,-2.5 2.5,2.5, body extent -2.5,-2.5 2.5,2.5, height 4.01
"TEST POINT" [mil]
  oct 60x60 smd: 1(0,0)
  silkscreen extent -37,-37 37,37
TS-1185EC-C-D-B [mm]
  rect 1.25x0.9 smd: 1(-1.925,0.75) 1(1.925,0.75) 2(-1.925,-0.75) 2(1.925,-0.75)
  silkscreen extent -2.84,-1.52 1.73,1.65, body extent -2.33,-1.5 2.32,1.5, height 2
U.FL-R-SMT-1(80) [mm]
  rect 1.02x1.07 smd: 1(0,-0.974)
  rect 1.07x2.2 smd: 2(1.475,0.974) 3(-1.475,0.974)
  silkscreen extent -1.22,-0.53 1.22,2.21, body extent -1.47,-0.74 1.53,2.36, height 1.2
UDD32C03L01 [mm]
  rect 0.5x0.6 smd: 1(-1.15,0) 2(1.15,0)
  silkscreen extent -0.91,-0.71 0.99,0.71, body extent -1.3,-0.67 1.3,0.67, height 1.1
UMH3N [mm]
  rect 0.8x0.4 smd: 1(-0.97,0.65) 2(-0.97,0) 3(-0.97,-0.65) 4(0.97,-0.65) 5(0.97,0) 6(0.97,0.65)
  silkscreen extent -1.25,-1.14 0.48,1.17, body extent -1.2,-1.1 1.2,1.1, height 1.08
VKMB1001E101MV [mm] "25V 5mm 10mm 100uF"
  rect 2.8x1.1 smd: 1(-2.1,0) 2(2.1,0)
  silkscreen extent -3.53,-2.65 2.65,2.65, body extent -3.15,-2.65 3.15,2.65, height 9.95
VT1H471MI135000CE0 [mm] "470uF ±20% 50V 12.5mm 13.5mm 1000hrs 105? -40?~+105? SMD,12.5x13.5mm Aluminum Electrolytic Capacitors - SMD RoHS"
  rect 6.2x1.75 smd: 1(-5.145,0) 2(5.145,0)
  silkscreen extent -8.62,-6.81 8.74,6.86, body extent -7.5,-6.85 7.5,6.85, height 14
X322540MPB4SI [mm]
  rect 1.4x1.2 smd: 1(-1.1,-0.85) 2(1.1,-0.85) 3(1.1,0.85) 4(-1.1,0.85)
  silkscreen extent -2.18,-1.3 1.65,1.3, body extent -1.6,-1.25 1.6,1.25, height 0.8
YPRH1207-181M [mm]
  rect 2.8x5.4 smd: 1(-4.9,0) 1(-4.9,0) 2(4.9,0)
  silkscreen extent -6.79,-6.3 6.3,6.3, body extent -6.25,-6.25 6.25,6.25, height 6

## Part data
C1 C2 C11 C13 C17 C18 C23 C35 C37 C48 C49 C50 C51: library part CC0603ZRY5V9BB104, "CAP CER 0.1UF 50V Y5V 0603", Capacitance=100nF, Case Code (Imperial)=0603, Case Code (Metric)=1608, Dielectric=Y5V, Manufacturer=Yageo, Max Operating Temperature=85°C, Min Operating Temperature=-30°C, Package Quantity=1, Supplier Part Number 1=311-1343-1-ND, Tolerance=80%, Voltage=50V, Case/Package=0603, ComponentLink1Description=http://www.yageo.com/documents/recent/UPY-GPHC_Y5V_6.3V-to-50V_8.pdf?src-supplier=Digi-Key, ComponentLink1URL=http://www.yageo.com/documents/recent/UPY-GPHC_Y5V_6.3V-to-50V_8.pdf?src-supplier=Digi-Key, ComponentLink2Description=http://www.yageo.com/documents/recent/UPY-GPHC_Y5V_6.3V-to-50V_5.pdf?src-supplier=Avnet+Europe, ComponentLink2URL=http://www.yageo.com/documents/recent/UPY-GPHC_Y5V_6.3V-to-50V_5.pdf?src-supplier=Avnet+Europe, ComponentLink3Description=https://www.verical.com/server-webapp/html/getDatasheet?partID=403611&src-supplier=Verical, ComponentLink3URL=https://www.verical.com/server-webapp/html/getDatasheet?partID=403611&src-supplier=Verical, ComponentLink4Description=http://www.mouser.com/ds/2/447/Yageo_UPY-GP_NP0_16V-to-50V_9-358835.pdf?src-supplier=Mouser, ComponentLink4URL=http://www.mouser.com/ds/2/447/Yageo_UPY-GP_NP0_16V-to-50V_9-358835.pdf?src-supplier=Mouser, ComponentLink5Description=http://www.farnell.com/datasheets/1132289.pdf?src-supplier=Element14, ComponentLink5URL=http://www.farnell.com/datasheets/1132289.pdf?src-supplier=Element14, Composition=Ceramic, Depth=0.8mm, Halogen Free="Halogen Free", Height=0.8mm, Lead Free="Lead Free", Length=1.6mm, Manufacturer Part Number=CC0603ZRY5V9BB104, Mount="Surface Mount", Number of Pins=2, Packaging="Tape and Reel", Pricing 1="1=0.1, 10=0.075, 100=0.0334, 500=0.02386, 1000=0.01874 (USD)", Radiation Hardening=No, REACH SVHC="No SVHC", Stock 1=15000880, Supplier 1=Digi-Key, Termination=SMD/SMT, Thickness=0.035inch, Voltage Rating=50V, Voltage Rating (DC)=50V, Width=0.031inch
C3 C6 C53 C57: library part VKMB1001E101MV, "25V 5mm 10mm 100uF 100kHz SMD,5x10mm Aluminum Electrolytic Cap- SMD ROHS", Manufacturer=Ymin, Voltage=25V, ComponentLink1Description=LCSC, ComponentLink1URL=https://lcsc.com/product-detail/Aluminum-Electrolytic-Capacitors-SMD_Ymin-VKMB1001E101MV_C487322.html, Manufacturer Part No=VKMB1001E101MV
C4 C7: library part VT1H471MI135000CE0, "470uF ±20% 50V 12.5mm 13.5mm 1000hrs 105℃ -40℃~+105℃ SMD,12.5x13.5mm Aluminum Electrolytic Capacitors - SMD RoHS", Lifetime @ Temp="1000hrs 105℃", Manufacturer="Changzhou Huawei Elec", Operating Temperature=-40℃~+105℃, Package=SMD,12.5x13.5mm, Rated Voltage=50V, Tolerance=±20%, Capacitance=470uF, L=13.5mm, φD=12.5mm
C5: library part CC0603KRX7R9BB471, "CAP CER 470pF 10% X7R 50V 0603 SMD", Case Code (Imperial)=0603, Case Code (Metric)=1608, Dielectric=X7R, Dielectric Material=Ceramic, Insulation Resistance=10GR, Manufacturer=Yageo, Max Operating Temperature=125°C, Min Operating Temperature=-55°C, Package Quantity=1, Supplier Part Number 1=311-1078-1-ND, Tolerance=10%, Voltage Rating=50V, Capacitance=470pF, Case/Package=0603, Category="Ceramic Capacitors", ComponentLink1Description=https://datasheet.ciiva.com/5425/upy-gphc-x7r-6-3v-to-50v-8-12304-5425461.pdf?src-supplier=Mouser, ComponentLink1URL=https://datasheet.ciiva.com/5425/upy-gphc-x7r-6-3v-to-50v-8-12304-5425461.pdf?src-supplier=Mouser, ComponentLink2Description=https://datasheet.ciiva.com/144/mlccorderingcode-144439.pdf?src-supplier=Digi-Key, ComponentLink2URL=https://datasheet.ciiva.com/144/mlccorderingcode-144439.pdf?src-supplier=Digi-Key, ComponentLink3Description=https://datasheet.ciiva.com/144/mlccorderingcode-144440.pdf?src-supplier=Digi-Key, ComponentLink3URL=https://datasheet.ciiva.com/144/mlccorderingcode-144440.pdf?src-supplier=Digi-Key, ComponentLink4Description=https://datasheet.ciiva.com/11587/upy-gphc-x7r-6-3v-to-50v-8-11587224.pdf?src-supplier=Avnet, ComponentLink4URL=https://datasheet.ciiva.com/11587/upy-gphc-x7r-6-3v-to-50v-8-11587224.pdf?src-supplier=Avnet, ComponentLink5Description=https://datasheet.ciiva.com/144/mlccorderingcode-144441.pdf?src-supplier=Digi-Key, ComponentLink5URL=https://datasheet.ciiva.com/144/mlccorderingcode-144441.pdf?src-supplier=Digi-Key, ComponentLink6Description=https://datasheet.ciiva.com/16623/upy-gphc-x7r-6-3v-to-50v-8-16623897.pdf?src-supplier=Avnet+Europe, ComponentLink6URL=https://datasheet.ciiva.com/16623/upy-gphc-x7r-6-3v-to-50v-8-16623897.pdf?src-supplier=Avnet+Europe, ComponentLink7Description=https://datasheet.ciiva.com/8033/1489800-8033898.pdf?src-supplier=Element14, ComponentLink7URL=https://datasheet.ciiva.com/8033/1489800-8033898.pdf?src-supplier=Element14, ComponentLink8Description=https://datasheet.ciiva.com/8033/1489800-8033899.pdf?src-supplier=Element14, ComponentLink8URL=https://datasheet.ciiva.com/8033/1489800-8033899.pdf?src-supplier=Element14, ComponentLink9Description=https://datasheet.ciiva.com/26829/getdatasheetpartid-251791-26829452.pdf?src-supplier=Verical, ComponentLink9URL=https://datasheet.ciiva.com/26829/getdatasheetpartid-251791-26829452.pdf?src-supplier=Verical, ComponentLink10Description=https://datasheet.ciiva.com/28450/1489800-28450652.pdf?src-supplier=Element14, ComponentLink10URL=https://datasheet.ciiva.com/28450/1489800-28450652.pdf?src-supplier=Element14, ComponentLink11Description=https://datasheet.ciiva.com/8033/70765-8033902.pdf?src-supplier=Element14, ComponentLink11URL=https://datasheet.ciiva.com/8033/70765-8033902.pdf?src-supplier=Element14, Depth=0.8mm, Dissipation Factor=2.5%, Halogen Free="Halogen Free", Height=0.8mm, Lead Free="Lead Free", Length=1.6mm, Manufacturer Part Number=CC0603KRX7R9BB471, Mount="Surface Mount", Number of Pins=2, Packaging="Tape and Reel", Pricing 1="1=0.10000, 10=0.04500, 50=0.02460, 100=0.02010, 500=0.01432, 1000=0.01125 (USD)", Radiation Hardening=No, REACH SVHC="No SVHC", Resistor Type=Ceramic, RoHS=Yes, RoHS Compliant=Yes, Series=CC, Stock 1=2173, Supplier 1=Digi-Key, Termination=SMD/SMT, Thickness=0.035inch, Voltage Rating (DC)=50V, Width=0.8mm
C8: library part CL05B152KB5NNNC, "CAP CER 1500PF 50V X7R 0402", Capacitance=1.5nF, Case Code (Imperial)=0402, Case Code (Metric)=1005, Dielectric=X7R, Manufacturer=Samsung, Max Operating Temperature=125°C, Min Operating Temperature=-55°C, Package Quantity=1, Supplier Part Number 1=7661526, Tolerance=10%, Voltage=50V, Case/Package=0402, Category="Ceramic Capacitors", ComponentLink1Description=https://datasheet.ciiva.com/16498/cl05b152kb5nnnc-16498493.pdf?src-supplier=Future+Electronics, ComponentLink1URL=https://datasheet.ciiva.com/16498/cl05b152kb5nnnc-16498493.pdf?src-supplier=Future+Electronics, ComponentLink2Description=https://datasheet.ciiva.com/15195/getdatasheetpartid-543173-15195639.pdf?src-supplier=Verical, ComponentLink2URL=https://datasheet.ciiva.com/15195/getdatasheetpartid-543173-15195639.pdf?src-supplier=Verical, ComponentLink3Description=https://datasheet.ciiva.com/29198/459134-da-01-en-vs-kondensator-0402-29198336.pdf?src-supplier=Conrad, ComponentLink3URL=https://datasheet.ciiva.com/29198/459134-da-01-en-vs-kondensator-0402-29198336.pdf?src-supplier=Conrad, ComponentLink4Description=https://datasheet.ciiva.com/26309/mlcc-catalogdownload2013-eng-26309021.pdf?src-supplier=Distrelec, ComponentLink4URL=https://datasheet.ciiva.com/26309/mlcc-catalogdownload2013-eng-26309021.pdf?src-supplier=Distrelec, Construction=Flat, Contact Plating=Tin, Depth=0.5mm, Height=0.5mm, Length=1mm, Manufacturer Part Number=CL05B152KB5NNNC, Material=Ceramic, Mount="Surface Mount", Packaging="Tape and Reel", Pricing 1="10000=0.00400, 30000=0.00400, 50000=0.00400, 100000=0.00300, 250000=0.00300 (USD)", Radiation Hardening=No, RoHS=Yes, RoHS Compliant=Yes, Series=CL, Stock 1=20000, Supplier 1=RSComponents, Thickness=0.022inch, Voltage Rating=50V, Width=0.02inch
C9 C22: library part CL10A106MA8NRNC, "CAP CER 10UF 25V X5R 0603", Case Code (Imperial)=0603, Case Code (Metric)=1608, Dielectric=X5R, Manufacturer=Samsung, Max Operating Temperature=85°C, Min Operating Temperature=-55°C, Package Quantity=1, Tolerance=20%, Voltage Rating=25V, Capacitance=10uF, Case/Package=0603, Category="Ceramic Capacitors", ComponentLink1Description=https://datasheet.ciiva.com/25766/cl10a106ma8nrnc-25766562.pdf?src-supplier=Digi-Key, ComponentLink1URL=https://datasheet.ciiva.com/25766/cl10a106ma8nrnc-25766562.pdf?src-supplier=Digi-Key, Construction=Flat, Contact Plating=Tin, Lead Free="Lead Free", Length=0.063inch, Manufacturer Part Number=CL10A106MA8NRNC, Mount="Surface Mount", Packaging="Tape and Reel", Pricing 1="4000=0.03753, 8000=0.03700, 16000=0.03595, 24000=0.03515, 32000=0.03383, 40000=0.03304, 400000=0.03225 (USD)", RoHS=Yes, RoHS Compliant=Yes, Series=CL, Supplier 1=Avnet, Supplier Part Number 1=CL10A106MA8NRNC, Termination=Wraparound, Thickness=0.035inch, Width=0.031inch
C10 C12 C32 C36 C43 C44 C45 C54 C55 C58 C63 C64 C66: library part CL10A105KA8NNNC, "CAP CER 1UF 25V X5R 0603", Case/Package=0603, Dielectric=X5R, Manufacturer=Sams, Max Operating Temperature=85°C, Min Operating Temperature=-55°C, Supplier Part Number 1=1276-1102-1-ND, Tolerance=10%, Voltage=25V, Capacitance=1uF, Depth=0.8mm, Height=0.8mm, Lead Free="Lead Free", Length=1.6mm, Manufacturer Part Number=CL10A105KA8NNNC, Mount="Surface Mount", Pricing 1="1=0.1, 10=0.036, 50=0.0198, 100=0.0161, 500=0.01152, 1000=0.00904 (USD)", Stock 1=2768758, Supplier 1=Digi-Key, Voltage Rating (DC)=25V
C14 C15: library part 04025A220FAT2A, "CAP CER 22PF 50V C0G/NP0 0402", Capacitance=22pF, Case Code (Imperial)=0402, Case Code (Metric)=1005, Dielectric=C0G, Manufacturer="Kyocera AVX", Max Operating Temperature=125°C, Min Operating Temperature=-55°C, Package Quantity=1, Supplier Part Number 1=478-5765-1-ND, Tolerance=1%, Voltage Rating=50V, Case/Package=0402, ComponentLink1Description=http://psearch.murata.com/capacitor/product/GCM219R71C105KA37%23.pdf, ComponentLink1URL=http://psearch.murata.com/capacitor/product/GCM219R71C105KA37%23.pdf, ComponentLink2Description=http://search.murata.co.jp/Ceramy/image/img/A01X/partnumbering_e_02.pdf, ComponentLink2URL=http://search.murata.co.jp/Ceramy/image/img/A01X/partnumbering_e_02.pdf, ComponentLink3Description=http://psearch.en.murata.com/capacitor/product/GCM219R71C105KA37%23.pdf, ComponentLink3URL=http://psearch.en.murata.com/capacitor/product/GCM219R71C105KA37%23.pdf, ComponentLink4Description=http://uk.rs-online.com/webdocs/0ef9/0900766b80ef92d0.pdf, ComponentLink4URL=http://uk.rs-online.com/webdocs/0ef9/0900766b80ef92d0.pdf, ComponentLink5Description=http://www.yageo.com/documents/recent/UPY-GP_NP0_16V-to-50V_16.pdf, ComponentLink5URL=http://www.yageo.com/documents/recent/UPY-GP_NP0_16V-to-50V_16.pdf, ComponentLink6Description=http://www.farnell.com/datasheets/1443161.pdf, ComponentLink6URL=http://www.farnell.com/datasheets/1443161.pdf, ComponentLink7Description=http://www.yageo.com/documents/recent/UPY-GP_NP0_16V-to-50V_8.pdf, ComponentLink7URL=http://www.yageo.com/documents/recent/UPY-GP_NP0_16V-to-50V_8.pdf, ComponentLink8Description=http://www.farnell.com/datasheets/1132289.pdf, ComponentLink8URL=http://www.farnell.com/datasheets/1132289.pdf, ComponentLink9Description=http://www.mouser.com/ds/2/447/Yageo_UPY-GP_NP0_16V-to-50V_9-358835.pdf, ComponentLink9URL=http://www.mouser.com/ds/2/447/Yageo_UPY-GP_NP0_16V-to-50V_9-358835.pdf, ComponentLink10Description=https://www.verical.com/server-webapp/html/getDatasheet?partID=370074, ComponentLink10URL=https://www.verical.com/server-webapp/html/getDatasheet?partID=370074, ComponentLink11Description=http://catalogs.avx.com/SurfaceMount.pdf, ComponentLink11URL=http://catalogs.avx.com/SurfaceMount.pdf, ComponentLink12Description=http://www.avxcorp.com/docs/Catalogs/ccog.pdf, ComponentLink12URL=http://www.avxcorp.com/docs/Catalogs/ccog.pdf, ComponentLink13Description=http://www.mouser.com/ds/2/40/C0GNP0-Dielectric-951274.pdf, ComponentLink13URL=http://www.mouser.com/ds/2/40/C0GNP0-Dielectric-951274.pdf, Contact Plating=Matte,Tin, Depth=0.5mm, Height=0.56mm, Lead Free="Lead Free", Length=1mm, Manufacturer Part Number=04025A220FAT2A, Mount="Surface Mount", Packaging="Tape and Reel", Pricing 1="1=0.67, 10=0.472, 100=0.3105, 500=0.23, 1000=0.1955, 2500=0.184, 5000=0.1725 (USD)", Radiation Hardening=No, REACH SVHC=Unknown, Stock 1=100000, Supplier 1=Digi-Key, Termination=SMD/SMT, Thickness=0.022inch, Voltage Rating (DC)=50V, Width=0.02inch
C16: library part CC0603KRX7R8BB101, "CAP CER 100PF 25V X7R 0603", Case Code (Imperial)=0603, Case Code (Metric)=1608, Dielectric=X7R, Manufacturer=Yageo, Max Operating Temperature=125°C, Min Operating Temperature=-55°C, Resistor Type=Ceramic, Tolerance=10%, Voltage Rating=25V, Capacitance=100pF, Case/Package=0603, Category="Ceramic Capacitors", ComponentLink1Description=https://datasheet.ciiva.com/13265/upy-gphc-x7r-6-3v-to-50v-8-12304-13265007.pdf?src-supplier=Mouser, ComponentLink1URL=https://datasheet.ciiva.com/13265/upy-gphc-x7r-6-3v-to-50v-8-12304-13265007.pdf?src-supplier=Mouser, Depth=0.8mm, Halogen Free="Halogen Free", Lead Free="Lead Free", Length=0.063inch, Manufacturer Part Number=CC0603KRX7R8BB101, Mount="Surface Mount", Packaging="Tape and Reel", Pricing 1="4000=0.00493, 8000=0.00479, 16000=0.00466, 24000=0.00452, 32000=0.00439 (USD)", RoHS=Yes, RoHS Compliant=Yes, Series=CC, Stock 1=12000, Supplier 1=Avnet, Supplier Part Number 1=CC0603KRX7R8BB101, Termination=SMD/SMT, Thickness=0.035inch, Voltage Rating (DC)=25V, Weight=7.1E-05oz, Width=0.031inch
C19: library part CL10A475KA8NQNC, "CAP CER 4.7UF 25V X5R 0603", Case Code (Imperial)=0603, Case Code (Metric)=1608, Dielectric=X5R, Manufacturer=Samsung, Max Operating Temperature=85°C, Min Operating Temperature=-55°C, Package Quantity=1, Tolerance=10%, Voltage Rating=25V, Capacitance=4.7uF, Case/Package=0603, Category="Ceramic Capacitors", ComponentLink1Description=https://datasheet.ciiva.com/25787/cl10a475ka8nqnc-25787017.pdf?src-supplier=Digi-Key, ComponentLink1URL=https://datasheet.ciiva.com/25787/cl10a475ka8nqnc-25787017.pdf?src-supplier=Digi-Key, Construction=Flat, Contact Plating=Tin, Depth=0.8mm, Lead Free="Lead Free", Length=1.6mm, Manufacturer Part Number=CL10A475KA8NQNC, Mount="Surface Mount", Packaging="Tape and Reel", Pricing 1="4000=0.08490, 8000=0.05240, 16000=0.05180, 24000=0.05130, 40000=0.05070 (USD)", RoHS=Yes, RoHS Compliant=Yes, Series=CL, Stock 1=260000, Supplier 1="Arrow Electronics", Supplier Part Number 1=CL10A475KA8NQNC, Termination=Wraparound, Thickness=0.035inch, Width=0.031inch
C20: library part CGA2B2X7R1H332M050BA, "CAP CER 3300PF 50V X7R 0402", Case Code (Imperial)=0402, Case Code (Metric)=1005, Manufacturer=TDK, Max Operating Temperature=125°C, Min Operating Temperature=-55°C, Package Quantity=10000, Ratings=AEC-Q200, Supplier Part Number 1=445-12276-1-ND, Tolerance=20%, Voltage Rating=50V, Capacitance=3.3nF, Case/Package=0402, Category="Ceramic Capacitors", ComponentLink1Description=https://product.tdk.com/info/en/documents/chara_sheet/CGA2B2X7R1H332M050BA.pdf?src-supplier=Digi-Key, ComponentLink1URL=https://product.tdk.com/info/en/documents/chara_sheet/CGA2B2X7R1H332M050BA.pdf?src-supplier=Digi-Key, ComponentLink2Description=https://product.tdk.com/info/en/catalog/datasheets/mlcc_automotive_general_en.pdf?src-supplier=Digi-Key, ComponentLink2URL=https://product.tdk.com/info/en/catalog/datasheets/mlcc_automotive_general_en.pdf?src-supplier=Digi-Key, ComponentLink3Description=http://product.tdk.com/en/catalog/datasheets/mlcc_automotive_general_en.pdf?src-supplier=Avnet, ComponentLink3URL=http://product.tdk.com/en/catalog/datasheets/mlcc_automotive_general_en.pdf?src-supplier=Avnet, Length=0.039inch, Manufacturer Part Number=CGA2B2X7R1H332M050BA, Mount="Surface Mount", Packaging="Tape and Reel", Pricing 1="1=0.10000, 10=0.05400, 50=0.02960, 100=0.02430, 500=0.01732, 1000=0.01361, 2500=0.01238, 5000=0.01138 (USD)", RoHS=Yes, RoHS Compliant=Yes, Series=CGA, Stock 1=30365, Supplier 1=Digi-Key, Thickness=0.022inch, Width=0.02inch
C21: library part CC0603KRX7R9BB103, "CAP CER 10nF 50V X7R 0603", Case Code (Imperial)=0603, Case Code (Metric)=1608, Dielectric=X7R, Insulation Resistance=100GR, Manufacturer=Yageo, Max Operating Temperature=125°C, Min Operating Temperature=-55°C, Package Quantity=1, Resistor Type=Ceramic, Tolerance=10%, Voltage=50V, Capacitance=10nF, Case/Package=0603, Category="Ceramic Capacitors", ComponentLink1Description=https://datasheet.ciiva.com/11788/0900766b8079c870-11788374.pdf?src-supplier=RSComponents, ComponentLink1URL=https://datasheet.ciiva.com/11788/0900766b8079c870-11788374.pdf?src-supplier=RSComponents, ComponentLink2Description=https://datasheet.ciiva.com/26862/getdatasheetpartid-403582-26862846.pdf?src-supplier=Verical, ComponentLink2URL=https://datasheet.ciiva.com/26862/getdatasheetpartid-403582-26862846.pdf?src-supplier=Verical, ComponentLink3Description=https://datasheet.ciiva.com/8033/70765-8033817.pdf?src-supplier=Element14, ComponentLink3URL=https://datasheet.ciiva.com/8033/70765-8033817.pdf?src-supplier=Element14, ComponentLink4Description=https://datasheet.ciiva.com/28450/1489800-28450619.pdf?src-supplier=Element14, ComponentLink4URL=https://datasheet.ciiva.com/28450/1489800-28450619.pdf?src-supplier=Element14, ComponentLink5Description=https://datasheet.ciiva.com/176/mlccorderingcode-176551.pdf?src-supplier=Digi-Key, ComponentLink5URL=https://datasheet.ciiva.com/176/mlccorderingcode-176551.pdf?src-supplier=Digi-Key, ComponentLink6Description=https://datasheet.ciiva.com/176/mlccorderingcode-176550.pdf?src-supplier=Digi-Key, ComponentLink6URL=https://datasheet.ciiva.com/176/mlccorderingcode-176550.pdf?src-supplier=Digi-Key, ComponentLink7Description=https://datasheet.ciiva.com/176/mlccorderingcode-176552.pdf?src-supplier=Digi-Key, ComponentLink7URL=https://datasheet.ciiva.com/176/mlccorderingcode-176552.pdf?src-supplier=Digi-Key, ComponentLink8Description=https://datasheet.ciiva.com/13389/upy-gphc-x7r-6-3v-to-50v-8-13389991.pdf?src-supplier=Mouser, ComponentLink8URL=https://datasheet.ciiva.com/13389/upy-gphc-x7r-6-3v-to-50v-8-13389991.pdf?src-supplier=Mouser, ComponentLink9Description=https://datasheet.ciiva.com/8033/1734573-8033816.pdf?src-supplier=Element14, ComponentLink9URL=https://datasheet.ciiva.com/8033/1734573-8033816.pdf?src-supplier=Element14, ComponentLink10Description=https://datasheet.ciiva.com/8033/1734573-8033861.pdf?src-supplier=Element14, ComponentLink10URL=https://datasheet.ciiva.com/8033/1734573-8033861.pdf?src-supplier=Element14, Depth=0.8mm, Halogen Free="Halogen Free", Height=0.8mm, Lead Free="Lead Free", Length=1.6mm, Manufacturer Part Number=CC0603KRX7R9BB103, Material=Ceramic, Mount="Surface Mount", Number of Pins=2, Packaging="Tape and Reel", Pricing 1="4000=0.03480, 8000=0.01770, 12000=0.01300, 40000=0.00630 (USD)", Radiation Hardening=No, REACH SVHC="No SVHC", RoHS=Yes, RoHS Compliant=Yes, Series=CC, Stock 1=1152000, Supplier 1="Arrow Electronics", Supplier Part Number 1=CC0603KRX7R9BB103, Termination=SMD/SMT, Thickness=0.035inch, Voltage Rating=50V, Voltage Rating (DC)=50V, Width=0.031inch
C24 C25 C26 C27 C28 C29 C30 C31: library part CL10A225KA8NNNC, "CAP CER 2.2UF 25V X5R 0603", Case Code (Imperial)=0603, Case Code (Metric)=1608, Dielectric=X5R, Manufacturer=Samsung, Max Operating Temperature=85°C, Min Operating Temperature=-55°C, Package Quantity=1, Supplier Part Number 1=1276-1879-1-ND, Tolerance=10%, Voltage Rating=25V, Capacitance=2.2uF, Case/Package=0603, Category="Ceramic Capacitors", ComponentLink1Description=https://datasheet.ciiva.com/25797/cl10a225ka8nnnc-25797781.pdf?src-supplier=Digi-Key, ComponentLink1URL=https://datasheet.ciiva.com/25797/cl10a225ka8nnnc-25797781.pdf?src-supplier=Digi-Key, Construction=Flat, Depth=0.8mm, Height=0.8mm, Lead Free="Lead Free", Length=1.6mm, Manufacturer Part Number=CL10A225KA8NNNC, Mount="Surface Mount", Packaging="Tape and Reel", Pricing 1="1=0.22000, 10=0.15000, 50=0.09000, 100=0.07610, 500=0.05206, 1000=0.04605 (USD)", Radiation Hardening=No, RoHS=Yes, RoHS Compliant=Yes, Series=CL, Stock 1=168888, Supplier 1=Digi-Key, Thickness=0.035inch, Voltage Rating (DC)=25V, Width=0.031inch
C33 C34: library part CC0603JRNPO9BN180, "CAP CER 18PF 50V C0G/NPO 0603", Case Code (Imperial)=0603, Case Code (Metric)=1608, Dielectric=C0G, Insulation Resistance=100GR, Manufacturer=Yageo, Max Operating Temperature=125°C, Min Operating Temperature=-55°C, Package Quantity=1, Resistor Type=Ceramic, Supplier Part Number 1=311-1061-6-ND, Temperature Coefficient=30ppm/°C, Tolerance=5%, Voltage Rating=50V, Capacitance=18pF, Case/Package=0603, Category="Ceramic Capacitors", ComponentLink1Description=https://datasheet.ciiva.com/144/mlccorderingcode-144638.pdf?src-supplier=Digi-Key, ComponentLink1URL=https://datasheet.ciiva.com/144/mlccorderingcode-144638.pdf?src-supplier=Digi-Key, ComponentLink2Description=https://datasheet.ciiva.com/144/mlccorderingcode-144637.pdf?src-supplier=Digi-Key, ComponentLink2URL=https://datasheet.ciiva.com/144/mlccorderingcode-144637.pdf?src-supplier=Digi-Key, ComponentLink3Description=https://datasheet.ciiva.com/144/mlccorderingcode-144639.pdf?src-supplier=Digi-Key, ComponentLink3URL=https://datasheet.ciiva.com/144/mlccorderingcode-144639.pdf?src-supplier=Digi-Key, ComponentLink4Description=https://datasheet.ciiva.com/28450/1443161-28450477.pdf?src-supplier=Element14, ComponentLink4URL=https://datasheet.ciiva.com/28450/1443161-28450477.pdf?src-supplier=Element14, ComponentLink5Description=https://datasheet.ciiva.com/46430/1835847-46430152.pdf?src-supplier=Element14, ComponentLink5URL=https://datasheet.ciiva.com/46430/1835847-46430152.pdf?src-supplier=Element14, ComponentLink6Description=https://datasheet.ciiva.com/5425/upy-gp-np0-16v-to-50v-8-5425439.pdf?src-supplier=Mouser, ComponentLink6URL=https://datasheet.ciiva.com/5425/upy-gp-np0-16v-to-50v-8-5425439.pdf?src-supplier=Mouser, ComponentLink7Description=https://datasheet.ciiva.com/8033/1734582-8033733.pdf?src-supplier=Element14, ComponentLink7URL=https://datasheet.ciiva.com/8033/1734582-8033733.pdf?src-supplier=Element14, ComponentLink8Description=https://datasheet.ciiva.com/11587/upy-gp-np0-16v-to-50v-8-11587323.pdf?src-supplier=Avnet, ComponentLink8URL=https://datasheet.ciiva.com/11587/upy-gp-np0-16v-to-50v-8-11587323.pdf?src-supplier=Avnet, Depth=0.8mm, Height=0.8mm, Lead Free="Lead Free", Length=1.6mm, Manufacturer Part Number=CC0603JRNPO9BN180, Mount="Surface Mount", Number of Pins=2, Packaging="Tape and Reel", Pricing 1="1=0.10000, 10=0.04000, 50=0.02200, 100=0.01790, 500=0.01282, 1000=0.01007 (USD)", Radiation Hardening=No, REACH SVHC="No SVHC", RoHS=Yes, RoHS Compliant=Yes, Series=CC, Stock 1=936645, Supplier 1=Digi-Key, Termination=SMD/SMT, Thickness=0.035inch, Voltage Rating (DC)=50V, Width=0.031inch
C38 C60: library part T491C106K016AT, "CAP TANT 10UF 10% 16V 2312", Case Code (Imperial)=2312, Case Code (Metric)=6032, Case/Package=Molded, Dielectric Material=Tantalum, ESR (Equivalent Series Resistance)=1.8R, Leakage Current=1.6uA, Manufacturer=KEMET, Max Operating Temperature=125°C, Min Operating Temperature=-55°C, Package Quantity=1, Ripple Current=247mA, Supplier Part Number 1=399-3732-1-ND, Tolerance=10%, Voltage=16V, Capacitance=10uF, Category="Tantalum Capacitors", ComponentLink1Description=https://datasheet.ciiva.com/11793/0900766b80718482-11793441.pdf?src-supplier=RSComponents, ComponentLink1URL=https://datasheet.ciiva.com/11793/0900766b80718482-11793441.pdf?src-supplier=RSComponents, ComponentLink2Description=https://datasheet.ciiva.com/5934/1732748-5934589.pdf?src-supplier=Farnell, ComponentLink2URL=https://datasheet.ciiva.com/5934/1732748-5934589.pdf?src-supplier=Farnell, ComponentLink3Description=https://datasheet.ciiva.com/34302/1573783-34302523.pdf?src-supplier=Jameco, ComponentLink3URL=https://datasheet.ciiva.com/34302/1573783-34302523.pdf?src-supplier=Jameco, ComponentLink4Description=https://datasheet.ciiva.com/258/kem-t2005-t491-258214.pdf?src-supplier=Digi-Key, ComponentLink4URL=https://datasheet.ciiva.com/258/kem-t2005-t491-258214.pdf?src-supplier=Digi-Key, ComponentLink5Description=https://datasheet.ciiva.com/48428/t491serie-eng-tds-48428639.pdf?src-supplier=Distrelec, ComponentLink5URL=https://datasheet.ciiva.com/48428/t491serie-eng-tds-48428639.pdf?src-supplier=Distrelec, ComponentLink6Description=https://datasheet.ciiva.com/14589/70095774-14589017.pdf?src-supplier=Allied+Electronics, ComponentLink6URL=https://datasheet.ciiva.com/14589/70095774-14589017.pdf?src-supplier=Allied+Electronics, ComponentLink7Description=https://datasheet.ciiva.com/14588/70095774-14588314.pdf?src-supplier=Allied+Electronics, ComponentLink7URL=https://datasheet.ciiva.com/14588/70095774-14588314.pdf?src-supplier=Allied+Electronics, ComponentLink8Description=https://datasheet.ciiva.com/258/kem-t2005-t491-258216.pdf?src-supplier=Digi-Key, ComponentLink8URL=https://datasheet.ciiva.com/258/kem-t2005-t491-258216.pdf?src-supplier=Digi-Key, ComponentLink9Description=https://datasheet.ciiva.com/258/kem-t2005-t491-258215.pdf?src-supplier=Digi-Key, ComponentLink9URL=https://datasheet.ciiva.com/258/kem-t2005-t491-258215.pdf?src-supplier=Digi-Key, ComponentLink10Description=https://datasheet.ciiva.com/7696/1854511-7696332.pdf?src-supplier=Element14, ComponentLink10URL=https://datasheet.ciiva.com/7696/1854511-7696332.pdf?src-supplier=Element14, ComponentLink11Description=https://datasheet.ciiva.com/7696/1446014-7696335.pdf?src-supplier=Element14, ComponentLink11URL=https://datasheet.ciiva.com/7696/1446014-7696335.pdf?src-supplier=Element14, ComponentLink12Description=https://datasheet.ciiva.com/7696/1854511-7696333.pdf?src-supplier=Element14, ComponentLink12URL=https://datasheet.ciiva.com/7696/1854511-7696333.pdf?src-supplier=Element14, ComponentLink13Description=https://datasheet.ciiva.com/7696/1854511-7696334.pdf?src-supplier=Element14, ComponentLink13URL=https://datasheet.ciiva.com/7696/1854511-7696334.pdf?src-supplier=Element14, ComponentLink14Description=https://datasheet.ciiva.com/8079/kem-t2005-t491-8079800.pdf?src-supplier=Element14, ComponentLink14URL=https://datasheet.ciiva.com/8079/kem-t2005-t491-8079800.pdf?src-supplier=Element14, ComponentLink15Description=https://datasheet.ciiva.com/5934/kem-t2005-t491-5934811.pdf?src-supplier=Farnell, ComponentLink15URL=https://datasheet.ciiva.com/5934/kem-t2005-t491-5934811.pdf?src-supplier=Farnell, ComponentLink16Description=https://datasheet.ciiva.com/39123/kem-t2005-t491-39123286.pdf?src-supplier=Onlinecomponents.com, ComponentLink16URL=https://datasheet.ciiva.com/39123/kem-t2005-t491-39123286.pdf?src-supplier=Onlinecomponents.com, ComponentLink17Description=https://datasheet.ciiva.com/18096/getdatasheetpartid-130368-18096090.pdf?src-supplier=Verical, ComponentLink17URL=https://datasheet.ciiva.com/18096/getdatasheetpartid-130368-18096090.pdf?src-supplier=Verical, Depth=3.2mm, Dissipation Factor=6%, Features="General Purpose", Height=2.5mm, Height - Seated (Max)=0.11inch, Lead Free="Lead Free", Length=6mm, Life (Hours)=2000Hour, Manufacturer Part Number=T491C106K016AT, Mount="Surface Mount,PCB", Packaging="Tape and Reel", Polarity=Polar, Pricing 1="1=0.71000, 10=0.50100, 50=0.37880, 100=0.33000 (USD)", Radiation Hardening=No, REACH SVHC="No SVHC", RoHS=Yes, RoHS Compliant=Yes, Stock 1=227896, Supplier 1=Digi-Key, Termination=SMD/SMT, Voltage Rating=16V, Voltage Rating (DC)=16V, Width=3.2mm
C39 C40: library part RVT1E100M0405, "CAP ALUM 10uF 25V SMD", Manufacturer=ROQANG, Operating Temperature=-45℃~+105℃, Rated Voltage=25V, Tolerance=±20%, Capacitance=10uF, L=5.4mm, φD=4mm
C41 C42: library part CL10A474KB8NNNC, "CAP CER 0.47UF 50V X5R 0603", Capacitance=470nF, Case Code (Imperial)=0603, Case Code (Metric)=1608, Dielectric=X5R, Manufacturer=Samsung, Max Operating Temperature=85°C, Min Operating Temperature=-55°C, Package Quantity=1, Tolerance=10%, Voltage Rating=50V, Case/Package=0603, Category="Ceramic Capacitors", ComponentLink1Description=https://datasheet.ciiva.com/25798/cl10a474kb8nnnc-25798516.pdf?src-supplier=Digi-Key, ComponentLink1URL=https://datasheet.ciiva.com/25798/cl10a474kb8nnnc-25798516.pdf?src-supplier=Digi-Key, ComponentLink2Description=https://datasheet.ciiva.com/15195/getdatasheetpartid-353290-15195713.pdf?src-supplier=Verical, ComponentLink2URL=https://datasheet.ciiva.com/15195/getdatasheetpartid-353290-15195713.pdf?src-supplier=Verical, Construction=Flat, Depth=0.8mm, Height=0.8mm, Lead Free="Lead Free", Length=1.6mm, Manufacturer Part Number=CL10A474KB8NNNC, Mount="Surface Mount", Packaging="Tape and Reel", Pricing 1="200000=0.04290, 300000=0.04250, 400000=0.04210, 500000=0.04170, 1000000=0.04120, 2000000=0.04080 (USD)", Radiation Hardening=No, RoHS=Yes, RoHS Compliant=Yes, Series=CL, Stock 1=196000, Supplier 1="Arrow Electronics", Supplier Part Number 1=CL10A474KB8NNNC, Thickness=0.035inch, Voltage Rating (DC)=50V, Width=0.031inch